# Altium PCB Master.PcbDoc
Units mm, origin at the board's own origin, x right, y up, seen from the top; angles counter-clockwise.
Board outline 72.21 x 96.21 mm, 2 copper layers (Top Layer, Bottom Layer); 19 components, 18 nets, 99 pads, 0 vias.
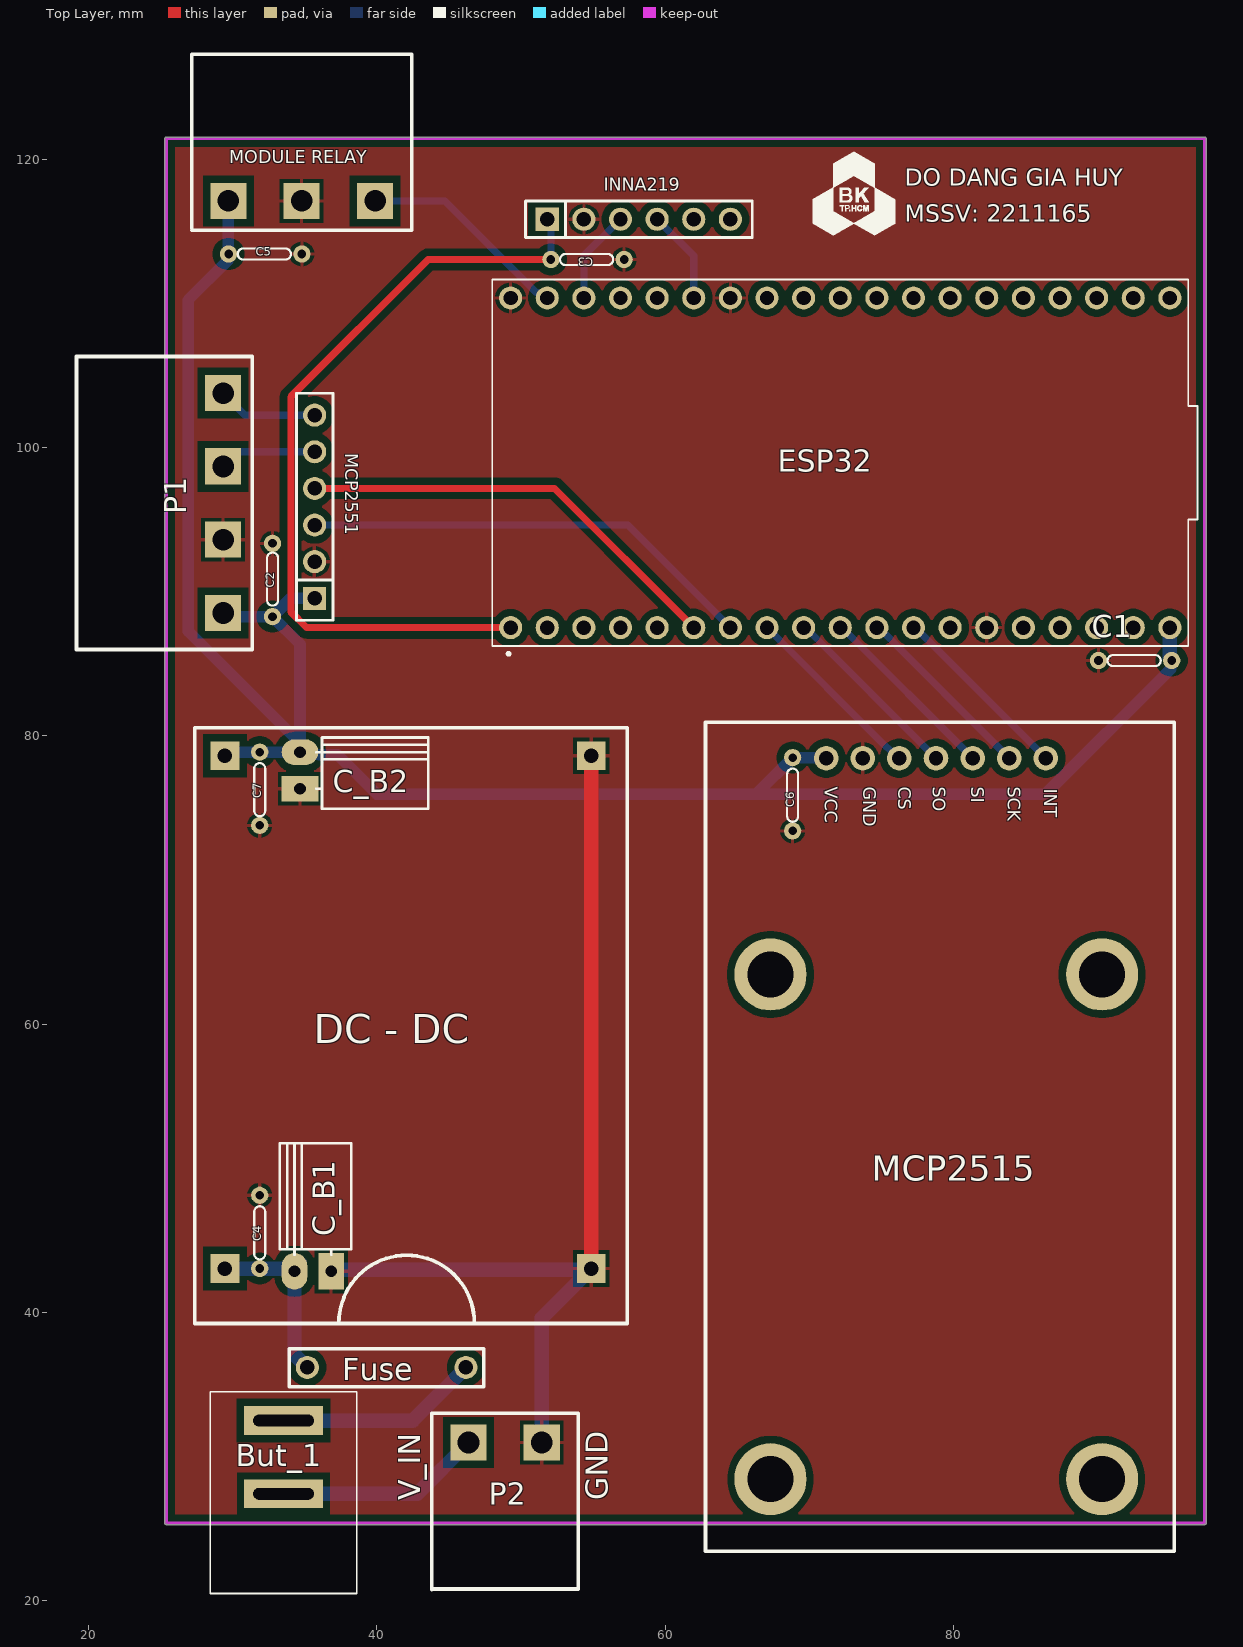
[diagram p0: Top Layer view]
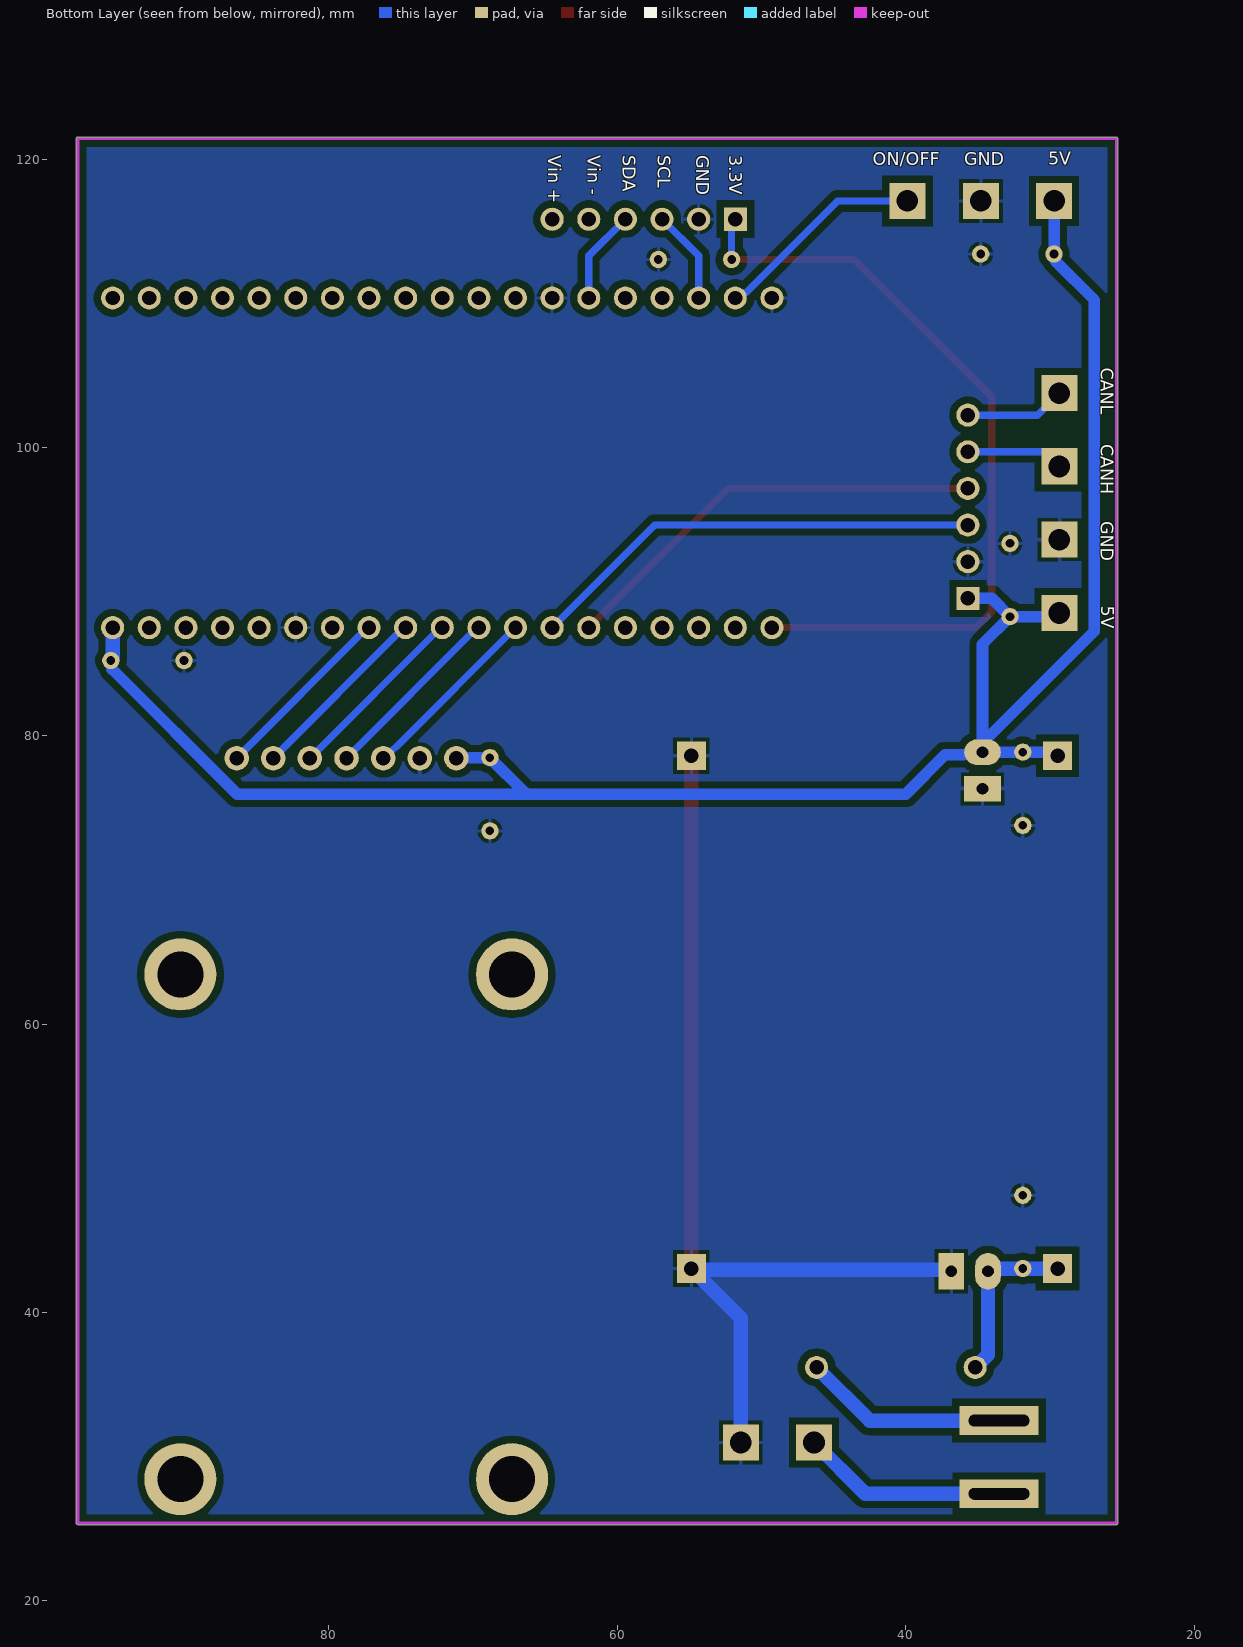
[diagram p1: Bottom Layer view, seen from below]

## Layer stack, top to bottom
Top Solder: solder mask 0.0102, Solder Resist, Dk 3.5
Top Layer: signal copper 0.0356
Dielectric 1: dielectric 0.32, FR-4, Dk 4.8
Bottom Layer: signal copper 0.0356
Bottom Solder: solder mask 0.0102, Solder Resist, Dk 3.5

## Board outline
25.4,25.3 cw(c25.4,25.4) 25.3,25.4 25.3,121.412 cw(c25.4,121.412) 25.4,121.512 97.409,121.512 cw(c97.409,121.412) 97.509,121.412 97.509,25.4 cw(c97.409,25.4) 97.409,25.3

## Design rules (kind name [scope] priority, off if disabled: settings)
Clearance Clearance_Polygon [InPolygon] p1: gap=0.5 ignorepadtopadclearanceinfootprint=FALSE
Clearance [All] p2: gap=0.3 ignorepadtopadclearanceinfootprint=FALSE
ComponentClearance [All] p1: gap=0 collisioncheckmode=3 verticalgap=0 showdistances=FALSE
PlaneClearance [All] p1: clearance=0.5
PlaneConnect [All] p1: planeconnectstyle=Direct reliefexpansion=0.508 reliefentries=4 reliefconductorwidth=0.254 reliefairgap=0.254
PolygonConnect [All] p1: connectstyle=Relief reliefconductorwidth=0.254 reliefentries=4 polygonreliefangle="90 Angle" airgapwidth=0.254
RoutingVias [All] p1: holewidth=0.711 width=1.27 viastyle="Through Hole" minholewidth=0.711 minwidth=1.27 maxholewidth=0.711 maxwidth=1.27
SolderMaskExpansion [All] p1: expansion=0.102 istentingtop=FALSE
Width power [InNetClass('Pwer')] p1: maxlimit=1.5 minlimit=0.5 preferedwidth=1
Width [All] p2: maxlimit=1 minlimit=0.3 preferedwidth=0.5
27 further rules are at their usual default settings.

## Components (designator, comment, footprint, x,y, rotation, side; value= is the part's Value field where it differs from the comment)
But_1 "Button" Button 33.528,32.512 r0 top
C1 "Capacitor Ceramic" Tu-ceramic 90.043,85.217 r0 top value=100nF
C2 "Capacitor Ceramic" Tu-ceramic 32.766,93.345 r270 top value=100nF
C3 "Capacitor Ceramic" Tu-ceramic 52.07,113.03 r0 top value=100nF
C4 "Capacitor Ceramic" Tu-ceramic 31.877,43.053 r90 top value="100nF 100V"
C5 "Capacitor Ceramic" Tu-ceramic 29.718,113.411 r0 top value=100nF
C6 "Capacitor Ceramic" Tu-ceramic 68.834,73.406 r90 top value=100nF
C7 "Capacitor Ceramic" Tu-ceramic 31.877,73.787 r90 top value=100nF
C_B1 "100uF 100V" CA-ALU-5W 36.83,42.862 r180 top value=104
C_B2 "220uF 35VV" CA-ALU-5W 34.671,76.327 r90 top value=104
"DC - DC" "Buck DC-DC" PCBComponent_1 54.864,43.053 r180 top (schematic designator B1)
ESP32 "NODEMCU-32S" MODULE_NODEMCU-32S 72.136,98.933 r90 top (schematic designator U1)
Fuse "Component_1" fuse 46.179,36.195 r180 top (schematic designator *1)
INNA219 "JP6" JP6-C1T 51.816,115.824 r0 top
MCP2515 "MCP2515_1" MCP2515 90.297,28.448 r180 top (schematic designator *)
MCP2551 "JP6" JP6-C1T 35.687,89.535 r90 top
"MODULE RELAY" "BIG_Header 3" "BIG_Header 3" 29.705,117.094 r0 top (schematic designator H_1)
P1 "BIG Header 4" "BIG_Header 4" 29.337,88.519 r90 top
P2 "Header 2" "BIG_Header 2" 51.435,30.988 r180 top

## Footprints (in the part's own frame and the unit in brackets; to place one, negate y for a bottom-side part, rotate by r counter-clockwise, add the part's x,y. Pads: shape width x height; smd on the part's side, far side on the other; paste and mask are expansions set on the pad)
"BIG_Header 2" [mm]
  rect 2.5x2.5 hole 1.5: 1(0,0) 2(5.08,0)
  silkscreen extent -2.54,-2.03 7.62,10.21, body extent -2.5,-1.75 7.58,10.25, height 3.15
"BIG_Header 3" [mm]
  rect 2.5x2.5 hole 1.5: 1(0,0) 2(5.08,0) 3(10.173,0)
  silkscreen extent -2.54,-2.03 12.71,10.16, body extent -2.5,-1.75 12.67,10.25, height 3.15
"BIG_Header 4" [mm]
  rect 2.5x2.5 hole 1.5: 1(0,0) 1(0,0) 2(5.08,0) 3(10.16,0) 3(10.173,0) 4(15.24,0)
  rect 2x2.5 hole 1.4: 2(5.08,0)
  silkscreen extent -2.54,-2.03 17.78,10.17, body extent -2.5,-1.75 17.74,10.25, height 3.15
Button [mm]
  rect 5.5x2 hole 0.8 slot 4.2 at 0 deg: 1(0,0) 2(0,-5.08)
  silkscreen extent -5.08,-12 5.08,2
CA-ALU-5W [mil] "Tu hoa < 22uF/16>50V"
  rect 70x100 hole 32: 1(0,0)
  oval 70x100 hole 32: 2(100,0)
  silkscreen extent -55,-350 140,-45, body extent -54,-351 144,16, height 199
fuse [mm]
  round 1.6 hole 1: 1(0,0) 2(11,0)
  silkscreen extent -1.23,-1.3 12.25,1.35
JP6-C1T [mm] "6 row, straight, gold plating"
  rect 1.6x1.6 hole 1: 1(0,0)
  round 1.6 hole 1: 2(2.54,0) 3(5.08,0) 4(7.62,0) 5(10.16,0) 6(12.7,0)
  silkscreen extent -1.52,-1.27 14.22,1.27, body extent -1.52,-1.25 14.22,1.25, height 8.51
MCP2515 [mm]
  round 1.7 hole 1: 1(3.9,-50) 2(6.44,-50) 3(8.98,-50) 4(11.52,-50) 5(14.06,-50) 6(16.6,-50) 7(19.14,-50)
  round 5 hole 3.2: 17(0,0) 18(23,0) 19(0,-35) 20(23,-35)
  silkscreen extent -5,-52.5 27.5,5
MODULE_NODEMCU-32S [mm]
  round 1.6 hole 1: J1_1(-11.43,22.86) J1_2(-11.43,20.32) J1_3(-11.43,17.78) J1_4(-11.43,15.24) J1_5(-11.43,12.7) J1_6(-11.43,10.16) J1_7(-11.43,7.62) J1_8(-11.43,5.08) J1_9(-11.43,2.54) J1_10(-11.43,0) J1_11(-11.43,-2.54) J1_12(-11.43,-5.08) J1_13(-11.43,-7.62) J1_14(-11.43,-10.16) J1_15(-11.43,-12.7) J1_16(-11.43,-15.24) J1_17(-11.43,-17.78) J1_18(-11.43,-20.32) J1_19(-11.43,-22.86) J2_1(11.43,22.86) J2_2(11.43,20.32) J2_3(11.43,17.78) J2_4(11.43,15.24) J2_5(11.43,12.7) J2_6(11.43,10.16) J2_7(11.43,7.62) J2_8(11.43,5.08) J2_9(11.43,2.54) J2_10(11.43,0) J2_11(11.43,-2.54) J2_12(11.43,-5.08) J2_13(11.43,-7.62) J2_14(11.43,-10.16) J2_15(11.43,-12.7) J2_16(11.43,-15.24) J2_17(11.43,-17.78) J2_18(11.43,-20.32) J2_19(11.43,-22.86)
  silkscreen extent -13.35,-24.78 12.7,24.13, body extent -12.7,-24.78 12.7,24.13, height 7.05
PCBComponent_1 [mm]
  rect 2x2 hole 1: 1(0,0) 2(25.4,0) 3(0,-35.56) 4(25.4,-35.56)
  silkscreen extent -2.5,-37.5 27.5,3.81
Tu-ceramic [mm] "Tu gom mini"
  round 1.2 hole 0.6: 1(0,0) 2(5.08,0)
  silkscreen extent 0.64,-0.38 4.32,0.38, body extent -0.38,-0.85 5.46,0.85, height 6.12

## Part data
C1 C2 C3 C4 C5 C6 C7: library part CapDecop, "Capacitor", LatestRevisionDate=17-Jul-2002, LatestRevisionNote="Re-released for DXP Platform.", PackageReference=RAD-0.3, Published=8-Jun-2000, Publisher="Altium Limited"
C_B1 C_B2: library part CN-ALU-DIP, "Capacitor (Semiconductor SIM Model)", LatestRevisionDate=17-Jul-2002, LatestRevisionNote="Re-released for DXP Platform.", PackageReference=C1206, Publisher="Altium Limited"
ESP32: "WIFI MODULE V1", Package=Package, Check_prices=https://www.snapeda.com/parts/NODEMCU-32S/AI-Thinker/view-part/?ref=eda, MF=AI-Thinker, MP=NODEMCU-32S, SnapEDA_Link=https://www.snapeda.com/parts/NODEMCU-32S/AI-Thinker/view-part/?ref=snap
INNA219 MCP2551: "WR-PHD 2.54 mm Angled Socket Header", Manufacturer="W¨¹rth Elektronik eiSos GmbH", partNo=613006143121, ComponentLink1 Description=Manufacturer, ComponentLink1URL=http://www.we-online.com, ComponentLink2 Description=Datasheet, ComponentLink2URL=http://katalog.we-online.de/em/datasheet/6130xx143121.pdf, Created by="Karrer Zheng", Created Date="29 March 2013", NoPins=06
MCP2515: library part MCP2515_*
P1: library part "BIG_Header 4"
P2: "Big Header 2"

## Nets (pads, with @x,y where several pads share a name; then routed paths per layer and width w, separated by ;. In a path a pad name is that pad's centre, name@x,y a point inside that pad or via, vN(x,y) a via of type N, cw(c..) or ccw(c..) an arc to the next point about the centre after c; other vN are vias at no path point)
+3.3: C3.1 ESP32.J1_1 INNA219.1 | length 55.5
  Top Layer w0.5: ESP32.J1_1 35.128,87.503 34.036,88.595 34.036,103.505 43.561,113.03 C3.1
  Bottom Layer w0.5: INNA219.1 52.07,115.57 C3.1
+5: "DC - DC.4" "MODULE RELAY.1" C1.2 C2.2 C5.1 C6.2 C7.2 C_B2.2 ESP32.J1_19 MCP2515.7 MCP2551.1 P1.1 | length 138
  Bottom Layer w0.5: 29.464,78.613 29.718,78.867 ; C1.2@94.996,85.344 C1.2
  Bottom Layer w0.8: P1.1@29.337,88.519 29.591,88.265 C2.2 ; 29.705,117.094 29.705,113.411 29.641,113.347 29.641,112.953 26.908,110.22 26.908,87.265 C_B2.2@34.671,79.502 ; 29.718,78.867 C7.2 C_B2.2@34.29,78.867 ; MCP2551.1 34.036,89.535 C2.2 ; 66.421,76.073 C6.2 C6.2@68.834,78.378 ; C6.2@68.853,78.467 71.138,78.467 MCP2515.7 ; C1.2 95.046,85.14 95.046,84.632 86.36,75.946 40.005,75.946 37.271,78.68 36.001,78.68 C_B2.2 C_B2.2@34.671,79.502 ; C2.2 34.671,86.36 C_B2.2@34.671,79.502
  Bottom Layer w1: C1.2@94.996,85.344 ESP32.J1_19
+60: "DC - DC.2" C4.1 C_B1.2 Fuse.2 | length 12.7
  Bottom Layer w0.5: C_B1.2@34.343,42.987 C_B1.2@34.908,43.552
  Bottom Layer w1: 29.464,43.053 34.099,43.053 C_B1.2 34.29,37.084 Fuse.2
CANH: MCP2551.5 P1.3 | length 6.8
  Bottom Layer w0.5: P1.3@29.331,98.685 29.337,98.679 30.337,99.679 30.614,99.679 30.63,99.695 MCP2551.5
CANL: MCP2551.6 P1.4 | length 7
  Bottom Layer w0.5: P1.4 30.861,102.235 MCP2551.6
GND: "DC - DC.1" "DC - DC.3" "MODULE RELAY.2" C1.1 C2.1 C3.2 C4.2 C5.2 C6.1 C7.1 C_B1.1 C_B2.1 ESP32.J1_14 ESP32.J2_1 ESP32.J2_7 INNA219.2 MCP2515.6 MCP2551.2 P1.2 P2.1 | length 67.7
  Top Layer w1: 54.364,78.625 54.864,78.613 54.864,43.053
  Bottom Layer w0.5: C_B1.1@36.83,42.735 C_B1.1
  Bottom Layer w1: C_B1.1 36.925,42.958 54.769,42.958 ; P2.1 51.435,39.624 54.769,42.958 ; 54.864,43.053 54.769,42.958
MISO: ESP32.J1_9 MCP2515.4 | length 12.9
  Bottom Layer w0.5: ESP32.J1_9 69.722,87.503 MCP2515.4
MOSI: ESP32.J1_10 MCP2515.3 | length 12.9
  Bottom Layer w0.5: ESP32.J1_10 72.262,87.503 MCP2515.3
Net*1_1: But_1.1 Fuse.1 | length 14.2
  Bottom Layer w1: But_1.1 42.496,32.512 Fuse.1
NetBut_1_2: But_1.2 P2.2 | length 14.3
  Bottom Layer w1: But_1.2 42.799,27.432 P2.2
PIN_INA_SCL: ESP32.J2_3 INNA219.3 | length 6.5
  Bottom Layer w0.5: ESP32.J2_3 54.356,113.284 INNA219.3
PIN_INA_SDA: ESP32.J2_6 INNA219.4 | length 6.5
  Bottom Layer w0.5: INNA219.4 61.976,113.284 ESP32.J2_6
PIN_RELAY_CONTROL: "MODULE RELAY.3" ESP32.J2_2 | length 14.7
  Bottom Layer w0.5: 39.878,117.094 44.704,117.094 51.056,110.742 51.16,110.742 51.539,110.363 ESP32.J2_2
PIN_VCAN_CS: ESP32.J1_8 MCP2515.5 | length 12.9
  Bottom Layer w0.5: ESP32.J1_8 75.293,79.266 MCP2515.5
PIN_VCAN_INT: ESP32.J1_12 MCP2515.1 | length 12.9
  Bottom Layer w0.5: ESP32.J1_12 77.342,87.503 MCP2515.1
RX_M: ESP32.J1_6 MCP2551.4 | length 30.3
  Top Layer w0.5: MCP2551.4 52.324,97.155 ESP32.J1_6
SCK: ESP32.J1_11 MCP2515.2 | length 12.9
  Bottom Layer w0.5: ESP32.J1_11 74.802,87.503 MCP2515.2
TX_M: ESP32.J1_7 MCP2551.3 | length 31.8
  Bottom Layer w0.5: MCP2551.3 57.404,94.615 ESP32.J1_7
pads on no net: ESP32.J1_2 ESP32.J1_3 ESP32.J1_4 ESP32.J1_5 ESP32.J1_13 ESP32.J1_15 ESP32.J1_16 ESP32.J1_17 ESP32.J1_18 ESP32.J2_4 ESP32.J2_5 ESP32.J2_8 ESP32.J2_9 ESP32.J2_10 ESP32.J2_11 ESP32.J2_12 ESP32.J2_13 ESP32.J2_14 ESP32.J2_15 ESP32.J2_16 ESP32.J2_17 ESP32.J2_18 ESP32.J2_19 INNA219.5 INNA219.6 MCP2515.17 MCP2515.18 MCP2515.19 MCP2515.20

## Polygon pours and split planes (outlines as drawn)
GND on Top Layer "GND_L01_P000" (solid, remove dead copper, pour order 0): 25.4,25.4 97.409,25.4 97.409,121.412 25.4,121.412
GND on Bottom Layer "GND_L02_P001" (solid, remove dead copper, pour order 1): 97.409,25.4 25.4,25.4 25.4,121.412 97.409,121.412

## Keep-outs
Keep-Out Layer:
  lines w0.2: 25.4,25.4 97.409,25.4 97.409,121.412 25.4,121.412 25.4,25.4

## Silkscreen, mask and mechanical layers (free items; w line width, h text height)
Top Overlay:
  drawing of 9 lines, arcs and shapes, not listed
  text "DO DANG GIA HUY" at 76.615,118.147 h1.2
  text "MSSV: 2211165" at 76.615,115.647 h1.2
  text "VCC" at 70.755,76.453 h1.5 r270
  text "GND" at 73.422,76.454 h1.5 r270
  text "CS" at 75.835,76.454 h1.5 r270
  text "SO" at 78.248,76.454 h1.5 r270
  text "SI" at 80.915,76.454 h1.5 r270
  text "SCK" at 83.455,76.454 h1.5 r270
  text "INT" at 85.979,76.327 h1.5 r270
  text "V_IN" at 43.004,26.973 h1.52 r90
  text "GND" at 56.007,26.973 h1.52 r90
Bottom Overlay:
  text "3.3V" at 52.562,120.269 h1.52 r90
  text "GND" at 54.848,120.269 h1.52 r90
  text "SCL" at 57.515,120.269 h1.52 r90
  text "SDA" at 59.928,120.269 h1.52 r90
  text "Vin -" at 62.368,120.268 h1.52 r90
  text "Vin +" at 65.109,120.268 h1.52 r90
  text "5V" at 30.099,119.286 h1.52
  text "GND" at 35.941,119.269 h1.52
  text "ON/OFF" at 42.291,119.269 h1.52
  text "CANL" at 26.781,105.537 h1.52 r90
  text "CANH" at 26.781,100.203 h1.52 r90
  text "GND" at 26.781,94.869 h1.52 r90
  text "5V" at 26.764,89.027 h1.52 r90